# Altium PCB CSI2-KRIA-KV260_Rev01.PcbDoc (part 3 of 3)
Units mm, origin at the board's own origin, x right, y up, seen from the top; angles counter-clockwise.
Board outline 119 x 44.5 mm, 4 copper layers (Layer1 Top, Layer2, Layer3, Layer4 Bottom), stack 1.59 mm thick; 145 components, 82 nets, 488 pads, 229 vias.
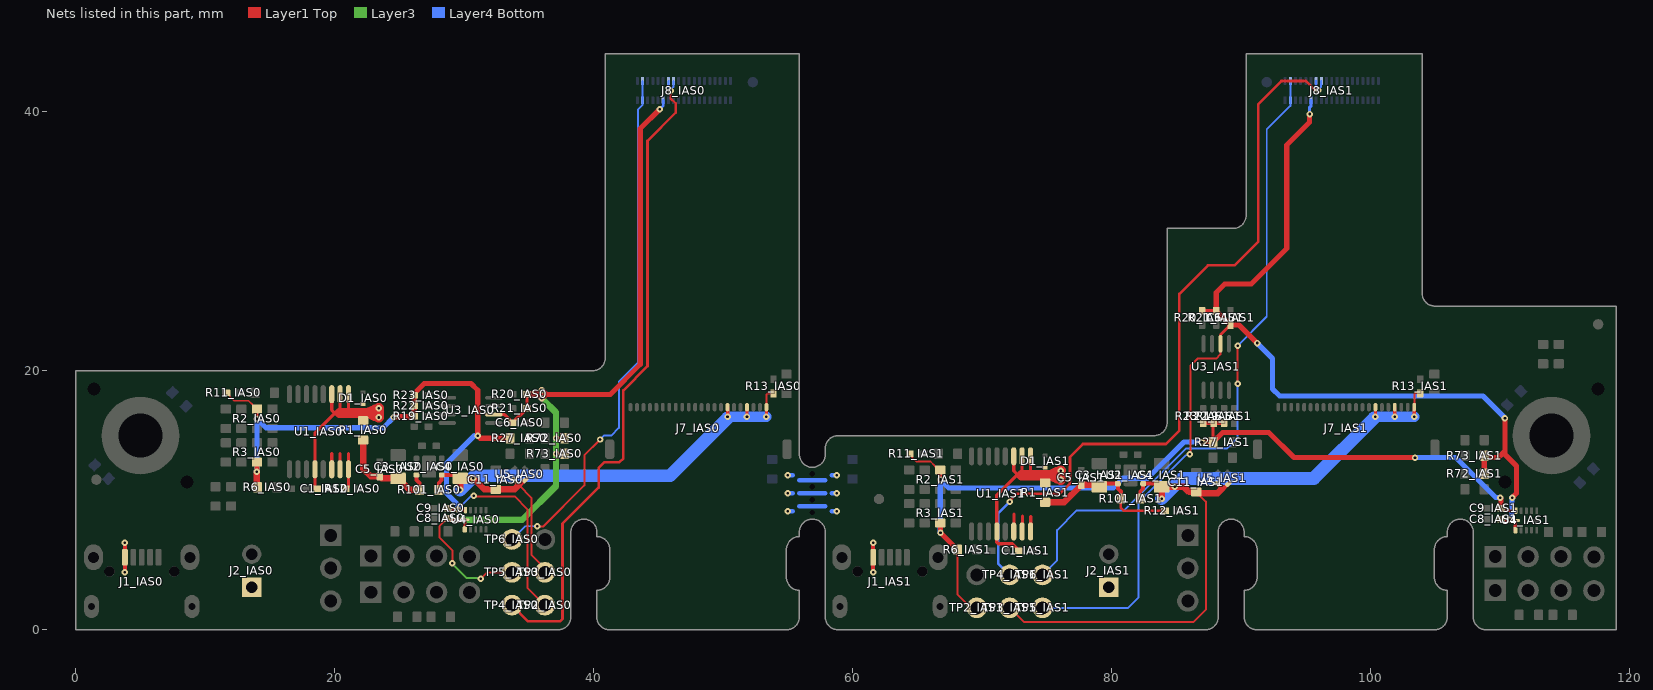
[diagram p5: the nets of this part, all layers, seen from the top]

## Via types
v1: diameter 0.5, hole 0.2, Layer1 Top to Layer4 Bottom, 229 vias

## Nets (pads, with @x,y where several pads share a name; then routed paths per layer and width w, separated by ;. In a path a pad name is that pad's centre, name@x,y a point inside that pad or via, vN(x,y) a via of type N, cw(c..) or ccw(c..) an arc to the next point about the centre after c; other vN are vias at no path point) (continued)
VCC1V2_IAS0: J8_IAS0.23 J8_IAS0.24 TP4_IAS0.1 | length 51.4
  Layer1 Top w0.2: TP4_IAS0.1@33.7,1.9 34.95,0.65 37.4,0.65 37.6,0.85 37.6,8.193 40.4,10.993 40.4,12.503 40.847,12.95 42,12.95 42.3,13.25 42.3,18.5 44.17,20.37 44.17,37.77 46.35,39.95 46.35,40.65 45.95,41.05 v1(45.95,41.65)
  Layer4 Bottom w0.15: J8_IAS0.23@45.78,42.4 45.79,42.39 45.79,42.01 ; 45.79,42.01 45.79,41.904 45.95,41.745 v1(45.95,41.65) ; v1@45.95,41.713 46.165,41.928 46.165,42.015 ; 46.165,42.015 46.165,42.385 J8_IAS0.24@46.18,42.4
VCC1V2_IAS1: J8_IAS1.23 J8_IAS1.24 TP4_IAS1.1 | length 59.2
  Layer1 Top w0.2: v1(72.15,9.9) 72.15,10 72.65,10.5 76,10.5 76.8,11.3 76.8,13.35 77.8,14.35 84.2,14.35 85.25,15.4 85.25,25.95 87.45,28.15 89.5,28.15 91.35,30 91.35,40.61 93.13,42.39 95.016,42.39 95.672,41.734 95.916,41.734 v1(95.98,41.67)
  Layer4 Bottom w0.15: J8_IAS1.23@95.81,42.42 95.82,42.41 95.82,42.03 ; 95.82,42.03 95.82,41.924 95.98,41.765 v1@95.98,41.733 ; v1(95.98,41.67) v1@95.98,41.733 ; 96.195,42.035 96.195,41.948 v1@95.98,41.733 ; 96.195,42.035 96.195,42.405 J8_IAS1.24@96.21,42.42
  Layer4 Bottom w0.2: TP4_IAS1.1@72.14,4.24 71.25,5.13 71.25,9 v1(72.15,9.9)
VCC1V8_IAS0: C6_IAS0.1 C8_IAS0.1 J8_IAS0.13 R20_IAS0.1 R21_IAS0.1 R72_IAS0.2 R73_IAS0.2 TP5_IAS0.1 U3_IAS0.2 U4_IAS0.1 U4_IAS0.12 | length 64.4
  Layer1 Top w0.15: C8_IAS0.1@28.7,8.6 28.1,8 28.1,7.139 29.1,6.139 v1(29.1,5.15) ; v1(31.3,3.95) 31.79,4.44 TP5_IAS0.1@33.7,4.44 ; v1(37.1,13.6) R73_IAS0.2@37.75,13.6 ; v1(37.1,14.8) R72_IAS0.2@37.75,14.8
  Layer1 Top w0.2: C8_IAS0.1@28.7,8.6 C8_IAS0.1@28.75,8.6 C8_IAS0.1@28.85,8.5 ; U4_IAS0.1@30.05,7.75 U4_IAS0.1@30.075,7.775
  Layer1 Top w0.25: C8_IAS0.1@28.85,8.5 v1(29.462,8.5) U4_IAS0.12@30.075,8.5 U4_IAS0.1@30.075,7.775 ; U3_IAS0.2@32.8,16.625 33.125,16.625 C6_IAS0.1@33.575,16.175 ; C6_IAS0.1@33.925,16.175 R21_IAS0.1@34.675,16.925 ; R21_IAS0.1@34.85,17.15 R20_IAS0.1@34.85,18.2
  Layer1 Top w0.4: 36.3,18.184 41.284,18.184 43.61,20.51 43.61,38.71 v1(45.1,40.2)
  Layer1 Top w0.5: R20_IAS0.1@34.95,18.2 35.7,18.2 v1(36,18.5) 36.3,18.2 ; 35.702,18.184 v1(36.002,17.884) 36.302,18.184
  Layer3 w0.15: v1(29.1,5.15) 29.1,5.1 30.2,4 31.25,4 v1(31.3,3.95)
  Layer3 w0.5: v1@29.46,8.5 34.5,8.5 37.1,11.1 v1(37.1,13.6) v1(37.1,14.8) 37.1,16.786 v1(36.002,17.884) ; v1@36,17.886 v1(36,18.5)
  Layer4 Bottom w0.15: J8_IAS0.13@45.38,40.9 J8_IAS0.13@45.39,40.89
  Layer4 Bottom w0.2: v1@45.217,40.317 45.39,40.49 J8_IAS0.13@45.39,40.89
  Layer4 Bottom w0.3: v1(45.1,40.2) v1@45.217,40.317
VCC1V8_IAS1: C6_IAS1.1 C8_IAS1.1 J8_IAS1.13 R20_IAS1.1 R21_IAS1.1 R72_IAS1.2 R73_IAS1.2 TP5_IAS1.1 U3_IAS1.2 U4_IAS1.1 U4_IAS1.12 | length 95
  Layer1 Top w0.15: v1(86.05,13.55) 86.117,13.617 86.117,20.417 86.65,20.95 88.1,20.95 88.425,21.275 U3_IAS1.2@88.425,22.1
  Layer1 Top w0.25: R20_IAS1.1@87,24.65 R21_IAS1.1@88.1,24.65 ; U3_IAS1.2@88.425,22.1 88.425,22.775 C6_IAS1.1@89.2,23.55 ; C8_IAS1.1@110.1,8.55 110.2,8.45 110.75,8.45 U4_IAS1.12@111.175,8.45 ; U4_IAS1.1@111.2,7.7 111.2,8.435 111.21,8.435 U4_IAS1.12@111.225,8.45
  Layer1 Top w0.4: v1(91.25,22.15) 89.85,23.55 C6_IAS1.1@89.2,23.55 R21_IAS1.1@88.1,24.65 88.1,26.05 88.75,26.7 90.8,26.7 93.55,29.45 93.55,37.45 95.31,39.21 v1@95.31,39.813 ; R72_IAS1.2@108.8,12.05 R73_IAS1.2@108.8,13.45 108.95,13.3 109.9,13.3 110.4,13.8 ; v1@110.4,16.3 110.4,13.8 ; v1(110.95,10.2) 111.3,10.55 111.3,12.65 110.4,13.55 110.4,13.8
  Layer4 Bottom w0.15: TP5_IAS1.1@74.68,1.7 81.3,1.7 82.1,2.5 82.1,9.85 85.733,13.483 85.983,13.483 v1(86.05,13.55)
  Layer4 Bottom w0.2: 95.39,40.44 95.42,40.47 J8_IAS1.13@95.42,40.9
  Layer4 Bottom w0.25: v1(95.31,39.84) 95.31,40.36 95.39,40.44
  Layer4 Bottom w0.4: v1(91.25,22.15) 92.45,20.95 92.45,18.6 93,18.05 108.7,18.05 v1(110.4,16.35) ; v1(110.75,8.5) 110.95,8.7 v1(110.95,10.2)
VCC2V75_IAS0: J8_IAS0.17 J8_IAS0.18 TP6_IAS0.1 | length 40.8
  Layer1 Top w0.15: v1(35.65,8) 35.6,8 35.7,7.9 v1@35.746,7.9 ; v1@35.826,7.98 36.13,7.98 39.3,11.15 39.3,13.5 v1(40.5,14.7)
  Layer4 Bottom w0.15: TP6_IAS0.1@33.7,6.98 34.72,8 v1(35.65,8) ; v1(40.5,14.7) 40.8,15 41.35,15 41.95,15.6 41.95,19.15 43.45,20.65 43.45,40.2 43.765,40.515 43.765,40.885 J8_IAS0.17@43.78,40.9 J8_IAS0.18@43.78,42.4
VCC2V75_IAS1: J8_IAS1.17 J8_IAS1.18 TP6_IAS1.1 | length 50.1
  Layer1 Top w0.15: v1(89.75,19) v1(89.75,21.95)
  Layer4 Bottom w0.15: TP6_IAS1.1@74.68,4.24 75.8,5.36 75.8,7.7 77.3,9.2 80.95,9.2 85.75,14 88.9,14 89.75,14.85 v1(89.75,19) ; v1(89.75,21.95) 92,24.2 92,38.65 93.82,40.47 J8_IAS1.17@93.82,40.9 J8_IAS1.18@93.82,42.4
VCC3V3_IAS0: C9_IAS0.1 R2_IAS0.1 R3_IAS0.1 R6_IAS0.1 R11_IAS0.1 R19_IAS0.2 R22_IAS0.2 R23_IAS0.2 R27_IAS0.2 TP2_IAS0.1 U4_IAS0.11 | length 58.8
  Layer1 Top w0.125: R11_IAS0.1@11.65,18.3 11.7,18.3 11.887,18.113 11.887,18.062 12.25,17.7 13.35,17.7 13.667,17.383 13.667,17.337 13.954,17.05 R2_IAS0.1@14,17.05
  Layer1 Top w0.15: v1(30.75,10.35) 30.8,10.3 33.9,10.3 34.89,9.31 34.89,3.25 TP2_IAS0.1@36.24,1.9
  Layer1 Top w0.25: v1(14,16.31) R2_IAS0.1@14,16.95 ; C9_IAS0.1@28.85,9.5 C9_IAS0.1@28.75,9.4 28.8,9.4 28.95,9.25 29.5,9.25 U4_IAS0.11@30.1,9.25
  Layer1 Top w0.4: v1(14,12.21) R3_IAS0.1@14,12.85 ; v1(24.55,16.4) 24.577,16.4 24.627,16.45 26.15,16.45 26.15,17.25 R22_IAS0.2@26.2,17.3 ; R23_IAS0.2@26.15,18.1 R23_IAS0.2@26.2,18.1 ; R22_IAS0.2@26.25,17.3 R22_IAS0.2@26.2,17.3 ; v1@29.5,9.25 v1(29.5,9.3) ; R27_IAS0.2@33.55,14.8 31.25,14.8 v1(31.05,15) 31.05,18.5 30.525,19.025 26.925,19.025 26.25,18.35 26.25,18.15 R23_IAS0.2@26.2,18.1 ; R22_IAS0.2@26.2,17.3 26.15,17.35 26.15,18.05 R23_IAS0.2@26.2,18.1
  Layer1 Top w0.5: R6_IAS0.1@14,10.95 v1(14,12.21)
  Layer4 Bottom w0.15: v1(29.5,9.3) 30.483,10.283 30.683,10.283 v1(30.75,10.35)
  Layer4 Bottom w0.4: v1(14,12.21) v1(14,16.31) 14.71,15.6 23.75,15.6 v1(24.55,16.4) ; v1(29.5,9.3) 29.5,9.7 28.65,10.55 28.65,12.85 30.8,15 v1(31.05,15)
  other v1: 14,12.21
VCC3V3_IAS1: C9_IAS1.1 R2_IAS1.1 R3_IAS1.1 R6_IAS1.1 R11_IAS1.1 R19_IAS1.2 R22_IAS1.2 R23_IAS1.2 R27_IAS1.2 TP2_IAS1.1 U4_IAS1.11 | length 68.2
  Layer1 Top w0.125: R11_IAS1.1@64.328,13.6 64.378,13.6 64.403,13.575 64.566,13.413 64.566,13.362 64.928,13 66.028,13 66.345,12.683 66.345,12.637 66.632,12.35 R2_IAS1.1@66.678,12.35
  Layer1 Top w0.15: R6_IAS1.1@68.1,6.2 68.1,2.75 69.15,1.7 TP2_IAS1.1@69.6,1.7
  Layer1 Top w0.2: C9_IAS1.1@110.1,9.4 110.3,9.2 U4_IAS1.11@111.2,9.2
  Layer1 Top w0.25: R2_IAS1.1@66.678,12.25 66.778,12.15 v1(66.778,11.61) ; R23_IAS1.2@87.1,15.95 R22_IAS1.2@87.9,15.95 ; R27_IAS1.2@87.85,14.5 87.85,15.9 R22_IAS1.2@87.9,15.95 ; R19_IAS1.2@88.7,15.95 R22_IAS1.2@87.9,15.95
  Layer1 Top w0.4: R3_IAS1.1@66.778,8.25 66.8,8.228 v1(66.8,7.5) R6_IAS1.1@68.1,6.2 ; v1(87,14.5) R27_IAS1.2@87.85,14.5 88.6,15.25 92.15,15.25 94.1,13.3 v1(103.45,13.3) ; v1(110.05,10.2) 110.1,10.15 C9_IAS1.1@110.1,9.4
  Layer4 Bottom w0.4: v1(66.8,7.5) 66.778,7.522 v1(66.778,11.61) 67.439,10.95 80.15,10.95 80.9,11.7 82.8,11.7 85.599,14.499 86.999,14.499 v1(87,14.5) ; v1(103.45,13.3) 106.6,13.3 109.681,10.219 110.031,10.219 v1(110.05,10.2)
VCC5V-CAM_IAS0: C3_IAS0.1 C5_IAS0.1 R1_IAS0.1 R12_IAS0.1 R101_IAS0.2 U1_IAS0.14 U1_IAS0.15 U1_IAS0.16 U2_IAS0.6 | length 13.9
  Layer1 Top w0.15: R12_IAS0.1@20.85,10.9 20.987,11.037 R12_IAS0.1@21.075,11.037
  Layer1 Top w0.2: R12_IAS0.1@21.075,11.037 U1_IAS0.16@21.075,12.4
  Layer1 Top w0.25: U1_IAS0.14@19.775,12.4 19.775,13.625 ; U1_IAS0.15@20.425,12.4 20.425,13.625 ; U1_IAS0.16@21.075,12.4 21.075,13.625
  Layer1 Top w0.3: U2_IAS0.6@26.325,11.95 26.339,11.936 26.339,11.561 26.55,11.35 R101_IAS0.2@26.55,10.8
  Layer1 Top w0.5: R1_IAS0.1@22.2,14.65 22.2,12.45 22.8,11.85 C5_IAS0.1@23.5,11.85 23.5,11.8 23.55,11.8 23.65,11.7 C3_IAS0.1@24.9,11.7 25.05,11.7 25.25,11.5 25.25,11.35 25.8,10.8 R101_IAS0.2@26.55,10.8
VCC5V-CAM_IAS1: C3_IAS1.1 C5_IAS1.1 R1_IAS1.1 R12_IAS1.1 R101_IAS1.2 U1_IAS1.14 U1_IAS1.15 U1_IAS1.16 U2_IAS1.6 | length 16.5
  Layer1 Top w0.2: R101_IAS1.2@80.728,10.137 80.728,9.422 80.95,9.2 R12_IAS1.1@84.15,9.2
  Layer1 Top w0.25: U1_IAS1.14@72.475,7.6 U1_IAS1.14@72.475,7.669 ; U1_IAS1.14@72.475,7.7 72.475,8.925 ; 72.475,8.675 U1_IAS1.14@72.475,7.669 ; U1_IAS1.14@72.544,7.6 U1_IAS1.14@72.475,7.669 ; U1_IAS1.15@73.125,7.6 73.125,8.775 ; U1_IAS1.16@73.775,7.6 73.775,8.725
  Layer1 Top w0.3: C3_IAS1.1@79.078,11.037 79.328,11.287 U2_IAS1.6@80.503,11.287 80.517,11.274 80.517,10.899 80.728,10.687 R101_IAS1.2@80.728,10.137
  Layer1 Top w0.4: C3_IAS1.1@78.928,11.187 C3_IAS1.1@79.078,11.037
  Layer1 Top w0.5: R1_IAS1.1@74.878,9.85 76.341,9.85 77.628,11.137 77.678,11.137 C5_IAS1.1@77.678,11.187 C3_IAS1.1@78.928,11.187
VCC5V-EXT: C1_IAS0.1 C1_IAS1.1 D1_IAS0.K D1_IAS1.K J1_IAS0.1 J1_IAS1.1 J2_IAS0.1 J2_IAS1.1 R1_IAS0.2 R1_IAS1.2 U1_IAS0.1 U1_IAS0.2 U1_IAS0.3 U1_IAS0.12 U1_IAS1.1 U1_IAS1.2 U1_IAS1.3 U1_IAS1.12 | length 47
  Layer1 Top w0.25: C1_IAS0.1@18.65,10.9 18.6,10.9 18.475,11.025 18.475,15.19 20.018,16.732 ; U1_IAS0.3@19.775,18.2 19.775,16.975 20.018,16.732 ; 20.15,16.6 20.018,16.732 ; 20.425,16.975 U1_IAS0.2@20.425,18.2 ; 21.075,16.975 U1_IAS0.1@21.075,18.2 ; 72.453,12.325 U1_IAS1.3@72.453,13.4 ; U1_IAS1.3@72.453,13.5 72.453,12.275 72.696,12.032 ; 72.696,11.932 71.153,10.39 U1_IAS1.12@71.153,7.6 71.153,6.747 71.25,6.65 72.35,6.65 72.8,6.2 C1_IAS1.1@72.85,6.2 ; 73.103,11.974 U1_IAS1.2@73.103,13.4 ; 73.753,11.976 U1_IAS1.1@73.753,13.4
  Layer1 Top w0.3: v1(3.8,4.46) J1_IAS0.1@3.8,5.1 ; J1_IAS0.1@3.8,6.1 v1(3.8,6.74) ; v1(61.6,4.46) J1_IAS1.1@61.6,5.1 ; J1_IAS1.1@61.6,6.1 v1(61.6,6.74)
  Layer1 Top w0.8: 20.4,16.75 23.05,16.75 ; 73.08,11.951 75.28,11.951 ; 23.05,16.75 v1(23.4,17.1) ; 23.05,16.75 v1(23.4,16.4) ; v1(23.4,16.4) v1(23.4,17.1) ; v1(23.4,16.4) 23.143,16.512 22.6,16.75 23.143,16.988 v1(23.4,17.1) ; 75.28,11.951 75.823,12.188 v1(76.08,12.301) ; 75.28,11.951 75.73,11.951 ; 75.28,11.951 75.823,11.713 v1(76.08,11.601) ; 75.73,11.951 v1(76.08,12.301) ; 75.73,11.951 v1(76.08,11.601) ; v1(76.08,11.601) v1(76.08,12.301)
  Layer4 Bottom w0.35: v1(55,9.15) 55.384,9.15 ; v1(55,10.55) 55.384,10.55 ; v1(55,11.95) 55.384,11.95 ; 55.9,9.55 57.884,9.55 ; 55.904,10.55 57.888,10.55 ; 55.904,11.55 57.888,11.55 ; 58.416,9.15 v1(58.8,9.15) ; 58.416,10.55 v1(58.8,10.55) ; 58.416,11.95 v1(58.8,11.95)
VCC-EXT-IN_IAS0: C4_IAS0.1 C11_IAS0.1 J7_IAS0.1 J7_IAS0.4 J7_IAS0.7 R13_IAS0.1 R101_IAS0.1 TP3_IAS0.1 U2_IAS0.1 U5_IAS0.3 U5_IAS0.4 | length 46.9
  Layer1 Top w0.15: 32.95,10.85 33,10.85 ; 34.25,11.2 34.25,11.15 35.2,10.2 35.2,5.8 36.24,4.76 TP3_IAS0.1@36.24,4.44 ; TP3_IAS0.1@36.44,4.44 TP3_IAS0.1@36.44,4.61 ; J7_IAS0.1@53.35,17.2 53.35,18.162 53.438,18.25 R13_IAS0.1@53.9,18.25
  Layer1 Top w0.25: v1(50.35,16.45) 50.359,16.459 50.359,17.141 J7_IAS0.7@50.35,17.15 ; v1(51.85,16.45) J7_IAS0.4@51.85,17.15 ; v1(53.35,16.45) J7_IAS0.1@53.35,17.15
  Layer1 Top w0.3: R101_IAS0.1@28.05,10.8 28.05,11.35 28.261,11.561 28.261,11.936 U2_IAS0.1@28.275,11.95 C4_IAS0.1@29.45,11.95 ; U5_IAS0.3@33.875,11.575 34.25,11.2 ; 34.275,11.125 U5_IAS0.4@34.725,11.575
  Layer1 Top w0.5: v1(29.7,10.8) 29.7,11.65 29.75,11.7 v1(30.7,11.7) 31.55,10.85 C11_IAS0.1@32.45,10.85 32.95,10.85 ; 33,10.85 33.9,10.85 34.25,11.2
  Layer4 Bottom w0.8: v1(50.35,16.45) v1(51.85,16.45) v1(53.35,16.45)
  Layer4 Bottom w1: v1(29.7,10.8) 30.8,11.9 45.9,11.9 v1@50.35,16.35
VCC-EXT-IN_IAS1: C4_IAS1.1 C11_IAS1.1 J7_IAS1.1 J7_IAS1.4 J7_IAS1.7 R13_IAS1.1 R101_IAS1.1 TP3_IAS1.1 U2_IAS1.1 U5_IAS1.3 U5_IAS1.4 | length 60.2
  Layer1 Top w0.15: TP3_IAS1.1@72.14,1.7 73.253,0.587 86.337,0.587 87.3,1.55 87.3,9.9 C11_IAS1.1@86.875,10.325 ; C11_IAS1.1@86.55,10.65 86.6,10.65 C11_IAS1.1@86.7,10.55 ; J7_IAS1.1@103.4,17.25 103.4,18.212 103.488,18.3 R13_IAS1.1@103.95,18.3
  Layer1 Top w0.25: v1(100.39,16.45) 100.399,16.459 100.399,17.141 J7_IAS1.7@100.39,17.15 ; v1(101.89,16.45) J7_IAS1.4@101.89,17.15 ; v1(103.39,16.45) J7_IAS1.1@103.39,17.15
  Layer1 Top w0.3: R101_IAS1.1@82.228,10.137 82.228,10.687 82.439,10.899 82.439,11.274 U2_IAS1.1@82.453,11.287 C4_IAS1.1@83.628,11.287 ; U5_IAS1.3@88.175,11.275 88.55,10.9 ; 88.575,10.825 U5_IAS1.4@89.025,11.275
  Layer1 Top w0.5: v1(83.878,10.137) C4_IAS1.1@83.878,11.037 ; C4_IAS1.1@83.928,11.037 v1@84.828,11.037 ; v1(84.878,11.037) 85.613,11.037 86,10.65 C11_IAS1.1@86.55,10.65 ; C11_IAS1.1@86.7,10.55 88.2,10.55 88.55,10.9
  Layer4 Bottom w0.8: v1(100.39,16.45) v1(101.89,16.45) v1(103.39,16.45)
  Layer4 Bottom w1: v1(83.878,10.137) v1@84.978,11.237 ; v1@84.878,11.128 85.45,11.7 95.64,11.7 v1@100.29,16.35
pads on no net: C50_IAS0.1 C50_IAS0.2 C50_IAS1.1 C50_IAS1.2 C51_IAS0.1 C51_IAS0.2 C51_IAS1.1 C51_IAS1.2 C52_IAS0.1 C52_IAS0.2 C52_IAS1.1 C52_IAS1.2 J1_IAS0. J1_IAS0.2 J1_IAS0.3 J1_IAS0.4 J1_IAS1. J1_IAS1.2 J1_IAS1.3 J1_IAS1.4 J7_IAS0.23 J7_IAS0.24 J7_IAS1.23 J7_IAS1.24 J8_IAS0.1 J8_IAS0.15 J8_IAS0.20 J8_IAS0.34 J8_IAS0.35 J8_IAS0.36 J8_IAS0.37 J8_IAS0.38 J8_IAS1.1 J8_IAS1.15 J8_IAS1.20 J8_IAS1.34 J8_IAS1.35 J8_IAS1.36 J8_IAS1.37 J8_IAS1.38 MRK1.1 MRK2.1 MRK3.1 MRK4.1 MRK5.1 MRK6.1 U1_IAS0.13 U1_IAS1.13 U2_IAS0.3 U2_IAS1.3 U4_IAS0.4 U4_IAS0.5 U4_IAS0.7 U4_IAS0.8 U4_IAS1.4 U4_IAS1.5 U4_IAS1.7 U4_IAS1.8
copper on no net: | length 8
  Layer1 Top w0.2: 10.856,3.27 11.856,3.27 ; 10.95,5.31 10.95,6.31 ; 10.95,5.81 11.95,5.81 ; 11.356,2.77 11.356,3.77 ; 77.056,3.27 78.056,3.27 ; 77.15,5.31 77.15,6.31 ; 77.15,5.81 78.15,5.81 ; 77.556,2.77 77.556,3.77

## Polygon pours and split planes (outlines as drawn)
GND on Layer3 "C-GND-IAS1" (solid, remove dead copper, pour order 9): 109.5,9.8 86.5,9.8 86.5,2.4 81.9,2.4 81.9,4.7 78.8,4.7 78.8,13.2 75.4,13.2 75.4,4.7 65.5,4.7 65.5,4.1 63,4.1 63,15 83.35,15 83.35,31 89.55,31 89.55,44 104.85,44 104.9,43.95 104.9,31 109.75,31 109.75,25 119,25 119,0 113,0 113,10.1 115,10.1 115,21.1 109.5,21.1
C-GND_IAS1 on Layer3 "C-GND-IAS1" (solid, remove dead copper, pour order 10): 109.7,9.6 86.7,9.6 86.7,2.2 57.9,2.2 57.9,0 112.8,0 112.8,10.3 114.8,10.3 114.8,20.9 109.7,20.9
GND on Layer3 "C-GND-IAS1" (solid, remove dead copper, pour order 3): 40.4,20 40.4,44 56,44 56,13.1 40.4,13.1 40.4,11.8 36.75,11.8 36.75,10.2 24.5,10.2 24.5,17.9 21.1,17.9 21.1,4.7 7.8,4.7 7.8,4.1 5.4,4.1 5.4,7.8 2.8,7.8 2.8,10.2 13,10.2 13,20
VCC5V-EXT on Layer3 "C-GND-IAS1" (solid, remove dead copper, pour order 2): 36.3,10 36.3,10.55 36.9,10.55 36.9,11.6 40.6,11.6 40.6,12.9 55.9,12.9 55.9,0 10.4,0 10.4,2.2 2.8,2.2 2.8,7.6 5.2,7.6 5.2,3.9 8,3.9 8,4.5 21.3,4.5 21.3,17.7 24.3,17.7 24.3,10
VCC5V-EXT on Layer3 "C-GND-IAS1" (solid, remove dead copper, pour order 8): 57.9,15 57.9,2.4 81.7,2.4 81.7,4.5 78.6,4.5 78.6,13 75.6,13 75.6,4.5 64.9,4.5 64.9,3.9 62.8,3.9 62.8,15
C-GND_IAS0 on Layer3 "C-GND-IAS1" (solid, remove dead copper, pour order 0): 10.2,2 10.2,0 0,0 0,20 12.8,20 12.8,10.4 2.6,10.4 2.6,2
GND on Layer2 "C-GND-IAS1" (solid, remove dead copper, pour order 11): 109.5,9.8 86.5,9.8 86.5,2.4 57.9,2.4 57.9,15 82.7,15 82.7,31 89.4,31 89.4,44 105.25,44 105.25,31.05 105.2,31 110.45,31 110.45,25.25 110.2,25 119,25 119,0 113,0 113,10.1 115,10.1 115,21.1 109.5,21.1
C-GND_IAS1 on Layer2 "C-GND-IAS1" (solid, remove dead copper, pour order 7): 109.7,9.6 86.7,9.6 86.7,2.2 57.9,2.2 57.9,0 112.8,0 112.8,10.3 114.8,10.3 114.8,20.9 109.7,20.9
GND on Layer2 "C-GND-IAS1" (solid, remove dead copper, pour order 6): 10.4,2.2 10.4,0 55.9,0 55.9,44 39.65,44 39.65,20 13,20 13,10.2 2.8,10.2 2.8,2.2
C-GND_IAS0 on Layer2 "C-GND-IAS1" (solid, remove dead copper, pour order 5): 10.2,2 10.2,0 0,0 0,20 12.8,20 12.8,10.4 2.6,10.4 2.6,2

## Keep-outs
Keep-Out Layer:
  lines w0.4: 40.251,7.2 cw(c40.251,6.2) 41.251,6.2 41.251,4.05 cw(c40.251,4.05) 40.251,3.05 40.25,3.05 40.25,0.99 40.251,1.001 ccw(c41.25,1) 41.249,0.001 ; 40.251,7.2 40.252,7.2 ; 40.252,7.2 40.252,7.55 ccw(c39.252,7.55) 38.252,7.55 38.25,7.55 38.25,0.999 cw(c37.251,0.999) 37.251,0 37.26,0 1,0 0,0 0,20 39.9,20 ccw(c39.9,21) 40.9,21 40.9,44.5 55.9,44.5 55.9,15 55.899,14.991 55.899,13.55 55.9,13.55 ccw(c56.9,13.55) 57.9,13.55 57.9,14 cw(c58.9,14) 58.9,15 83,15 83.3,15 ccw(c83.3,16) 84.3,16 84.3,31.001 89.401,31.001 ccw(c89.401,32) 90.4,32 90.4,44.5 104,44.5 104,26 ccw(c105,26) 105,25 119,25 119,0 108.94,0 108.949,0 cw(c108.949,0.999) 107.95,0.999 107.95,7.55 107.948,7.55 ccw(c106.948,7.55) 105.948,7.55 105.948,7.2 105.949,7.2 ccw(c105.949,6.2) 104.949,6.2 104.949,6.21 104.949,4.05 ccw(c105.949,4.05) 105.949,3.05 105.948,3.05 105.948,1 105.949,1 cw(c104.95,1) 104.95,0 91.25,0 cw(c91.25,1) 90.251,1 90.252,1 90.252,3.05 90.251,3.05 ccw(c90.251,4.05) 91.251,4.05 91.251,6.2 ccw(c90.251,6.2) 90.251,7.2 90.252,7.2 90.252,7.55 ccw(c89.252,7.55) 88.252,7.55 88.25,7.55 88.25,0.999 cw(c87.251,0.999) 87.251,0 87.26,0 58.9,0 cw(c58.9,0.999) 57.901,0.999 57.901,7.55 57.899,7.55 ccw(c56.899,7.55) 55.899,7.55 55.899,7.2 55.9,7.2 ccw(c55.9,6.2) 54.9,6.2 54.9,6.21 54.9,4.05 ccw(c55.9,4.05) 55.9,3.05 55.899,3.05 55.899,1 55.9,1 cw(c54.901,0.999) 54.901,0 54.9,0 41.25,0 ; 41.249,0.001 41.25,0

## Other copper
Layer1 Top:
  region net VCC5V-EXT: 75.278,12.286 75.378,12.286 75.028,12.636 74.728,12.636 74.428,12.336 73.928,12.336 73.878,12.386 73.628,12.386 73.578,12.336 73.278,12.336 73.228,12.386 72.628,12.386 72.578,12.436 72.328,12.436 72.328,11.986 72.778,11.536 75.278,11.536
  region net VCC5V-EXT: 75.28,12.286 75.38,12.286 75.03,12.636 74.73,12.636 74.43,12.336 73.93,12.336 73.88,12.386 73.63,12.386 73.58,12.336 73.28,12.336 73.23,12.386 72.63,12.386 72.58,12.436 72.33,12.436 72.33,11.986 72.78,11.536 75.28,11.536
  region net VCC5V-EXT: 75.28,12.286 75.38,12.286 75.03,12.636 74.73,12.636 74.43,12.336 73.93,12.336 73.88,12.386 73.63,12.386 73.58,12.336 73.28,12.336 73.23,12.386 72.63,12.386 72.58,12.436 72.33,12.436 72.33,11.986 72.78,11.536 75.28,11.536
  region net VCC5V-CAM_IAS1: 73.928,8.636 73.928,9.136 74.378,9.586 74.878,9.586 75.278,9.586 75.278,10.086 73.428,10.086 72.328,8.986 72.328,8.536 72.578,8.536 72.628,8.586 73.228,8.586 73.278,8.636 73.578,8.636 73.628,8.586 73.878,8.586
  region net VCC5V-CAM_IAS0: 21.25,13.436 21.25,13.936 21.7,14.386 22.2,14.386 22.6,14.386 22.6,14.886 20.75,14.886 19.65,13.786 19.65,13.336 19.9,13.336 19.95,13.386 20.55,13.386 20.6,13.436 20.9,13.436 20.95,13.386 21.2,13.386
  region net VCC5V-CAM_IAS0: 21.25,13.436 21.25,13.936 21.7,14.386 22.2,14.386 22.6,14.386 22.6,14.886 20.75,14.886 19.65,13.786 19.65,13.336 19.9,13.336 19.95,13.386 20.55,13.386 20.6,13.436 20.9,13.436 20.95,13.386 21.2,13.386
  region net VCC5V-EXT: 22.6,17.086 22.7,17.086 22.35,17.436 22.05,17.436 21.75,17.136 21.25,17.136 21.2,17.186 20.95,17.186 20.9,17.136 20.6,17.136 20.55,17.186 19.95,17.186 19.9,17.236 19.65,17.236 19.65,16.786 20.1,16.336 22.6,16.336
  region net VCC5V-EXT: 22.6,17.086 22.7,17.086 22.35,17.436 22.05,17.436 21.75,17.136 21.25,17.136 21.2,17.186 20.95,17.186 20.9,17.136 20.6,17.136 20.55,17.186 19.95,17.186 19.9,17.236 19.65,17.236 19.65,16.786 20.1,16.336 22.6,16.336
  region net GND: 57.3,10.15 57.3,9.95 57.025,9.675 58.4,8.3 58.4,12.8 57.025,11.425 57.3,11.15 57.3,10.95 56.9,10.55
  region net GND: 56.5,10.95 56.5,11.15 56.775,11.425 55.4,12.8 55.4,8.3 56.775,9.675 56.5,9.95 56.5,10.15 56.9,10.55
  text "ON" at 105.347,20.772 h0.8 r90
  text "IAS0" at 53.7,20.75 h1 r90
  text "ON" at 55.21,20.75 h0.8 r90
  text "IAS1" at 104.05,20.75 h1 r90
  text "1" at 2.2,18.5 h0.8
  text "PS" at 9.3,18.5 h0.8
  text "J7" at 91.05,11.9 h0.8
  text "CAM" at 93.35,11.9 h0.8
  text "J7" at 41.055,11.74 h0.8
  text "CAM" at 43.355,11.74 h0.8
  text "J1" at 59.69,7.32 h0.8
  text "J1" at 1.5,7.3 h0.8
  text "J10" at 21.95,7.25 h0.7
  text "J10" at 108.98,7.21 h0.7
  text "PWREN" at 84.35,4.55 h0.8 r90
  text "PWREN" at 18.1,4.25 h0.8 r90
  text "J6" at 18.1,1.45 h0.8 r90
  text "J6" at 84.3,1.45 h0.8 r90
  text "CSI2-KRIA-KV260 Rev.01" at 90.99,0.99 h0.68
  text "DC IN 5V" at 10.3,0.94 h0.8
  text "DC IN 5V" at 76.5,0.94 h0.8
  text "1" at 108.752,0.838 h0.6
  text "J9" at 109.48,0.81 h0.7
  text "1" at 21.672,0.778 h0.6
  text "J9" at 22.6,0.7 h0.7
Layer2:
  text "2" at 2.9,18.5 h0.8
  text "Layer 2" at 72.5,-11.5 h0.9
Layer3:
  text "3" at 4,18.5 h0.8
  text "Layer 3" at 72.5,-11.5 h0.9
Layer4 Bottom:
  region net VCC5V-EXT: 55.4,12.125 56.075,12.125 56.775,11.425 56.5,11.15 56.5,10.95 56.9,10.55 56.5,10.15 56.5,9.95 56.775,9.675 56.075,8.975 55.4,8.975
  region net VCC5V-EXT: 58.396,8.975 57.721,8.975 57.021,9.675 57.296,9.95 57.296,10.15 56.896,10.55 57.296,10.95 57.296,11.15 57.021,11.425 57.721,12.125 58.396,12.125
  text "4" at 4.9,18.5 h0.8
  text "SS" at 10.8,18.5 h0.8

## Silkscreen, mask and mechanical layers (free items; w line width, h text height)
Top Overlay:
  lines w0.1: 76.4,0.8 83.2,0.8 ; 10.2,0.8 10.2,8.34 ; 10.2,0.8 10.2,8.34 ; 10.2,0.8 17,0.8 ; 10.2,0.8 17,0.8 ; 10.2,8.34 17,8.34 17,0.8 ; 83.2,0.8 83.2,8.34 76.41,8.34 76.41,0.8 83.2,0.8
Top Solder:
  lines w0.25: 10.856,3.27 11.856,3.27 ; 10.95,5.31 10.95,6.31 ; 10.95,5.81 11.95,5.81 ; 11.356,2.77 11.356,3.77 ; 77.056,3.27 78.056,3.27 ; 77.15,5.31 77.15,6.31 ; 77.15,5.81 78.15,5.81 ; 77.556,2.77 77.556,3.77
  text "ON" at 105.35,20.77 h0.8 r90
  text "IAS0" at 53.7,20.75 h1 r90
  text "ON" at 55.21,20.75 h0.8 r90
  text "IAS1" at 104.05,20.75 h1 r90
  text "J7" at 91.05,11.9 h0.8
  text "CAM" at 93.35,11.9 h0.8
  text "J7" at 41.048,11.74 h0.8
  text "CAM" at 43.348,11.74 h0.8
  text "J1" at 59.69,7.32 h0.8
  text "J1" at 1.5,7.3 h0.8
  text "J10" at 21.95,7.25 h0.7
  text "J10" at 108.98,7.21 h0.7
  text "PWREN" at 84.35,4.55 h0.8 r90
  text "PWREN" at 18.1,4.25 h0.8 r90
  text "J6" at 18.1,1.45 h0.8 r90
  text "J6" at 84.3,1.45 h0.8 r90
  text "CSI2-KRIA-KV260 Rev.01" at 90.99,0.99 h0.68
  text "DC IN 5V" at 10.3,0.95 h0.8
  text "DC IN 5V" at 76.5,0.95 h0.8
  text "1" at 108.752,0.838 h0.6
  text "J9" at 109.48,0.81 h0.7
  text "1" at 21.673,0.778 h0.6
  text "J9" at 22.6,0.7 h0.7
Mechanical 1:
  lines w0.025: 37.251,0 ccw(c37.251,0.999) 38.25,0.999 38.25,7.55 ; 37.26,0 1,0 0,0 0,20 1,20 17,20 39.9,20 ccw(c39.9,21) 40.9,21 40.9,44 40.9,44.5 ; 38.252,7.55 cw(c39.252,7.55) 40.252,7.55 40.252,7.2 cw(c40.251,6.2) 41.251,6.2 41.251,4.05 cw(c40.251,4.05) 40.251,3.05 ; 40.25,0.99 40.25,3.05 ; 40.251,1.001 ccw(c41.25,1) 41.249,0.001 54.9,0 ; 54.9,6.2 cw(c55.9,6.2) 55.9,7.2 ; 54.9,6.21 54.9,4.05 ccw(c55.9,4.05) 55.9,3.05 ; 54.901,0 ccw(c54.901,0.999) 55.9,1 ; 55.899,1 55.899,3.05 ; 55.899,7.2 55.899,7.55 cw(c56.899,7.55) 57.899,7.55 ; 55.899,13.55 55.899,14.991 ; 55.9,13.55 ccw(c56.9,13.55) 57.9,13.55 57.9,14 cw(c58.9,14) 58.9,15 83,15 ; 55.9,15 55.9,44.5 40.9,44.5 ; 57.901,7.55 57.901,0.999 ccw(c58.9,0.999) 58.9,0 87.26,0 ; 84.3,31 84.3,16 cw(c83.3,16) 83.3,15 83,15 ; 84.3,31.001 89.401,31.001 ccw(c89.401,32) 90.4,32 90.4,44 90.4,44.5 ; 87.251,0 ccw(c87.251,0.999) 88.25,0.999 88.25,7.55 ; 88.252,7.55 cw(c89.252,7.55) 90.252,7.55 90.252,7.2 ; 90.251,1 ccw(c91.25,1) 91.25,0 104.95,0 ccw(c104.95,1) 105.949,1 ; 90.251,3.05 ccw(c90.251,4.05) 91.251,4.05 91.251,6.2 ccw(c90.251,6.2) 90.251,7.2 ; 90.252,1 90.252,3.05 ; 104.949,6.2 cw(c105.949,6.2) 105.949,7.2 ; 104.949,6.21 104.949,4.05 ccw(c105.949,4.05) 105.949,3.05 ; 105.948,1 105.948,3.05 ; 105.948,7.2 105.948,7.55 cw(c106.948,7.55) 107.948,7.55 ; 107.95,7.55 107.95,0.999 ccw(c108.949,0.999) 108.949,0 ; 108.94,0 119,0 119,1 119,24 119,25 ; 117.999,25 119,25 ; 118,25 110,25 105,25 cw(c105,26) 104,26 104,32 104,44.5 90.4,44.5 ; 40.9,44.5 40.9,44.5 ; 83,15 83,15 ; 90.4,44.5 90.4,44.5 ; 119,25 119,25
Mechanical 5:
  region: 54.1,13.2 42.1,13.2 42.1,-1.2 54.1,-1.2
  region: 104.1,13.2 92.1,13.2 92.1,-1.2 104.1,-1.2
Drill Drawing:
  circle w0.1: c65.133,62.839 r0.389
  circle w0.1: c65.133,61.089 r0.233
  circle w0.1: c65.133,61.089 r0.389
  lines w0.1: -12.472,61.7 -7.896,61.7 2.234,61.7 11,61.7 17.827,61.7 24.331,61.7 ; -12.472,63.3 -7.896,63.3 2.234,63.3 11,63.3 17.827,63.3 24.331,63.3 ; -12.472,64.9 -7.896,64.9 2.234,64.9 11,64.9 17.827,64.9 24.331,64.9 ; -12.472,66.5 -7.896,66.5 2.234,66.5 11,66.5 17.827,66.5 24.331,66.5 ; -12.472,68.1 -7.896,68.1 2.234,68.1 11,68.1 17.827,68.1 24.331,68.1 ; -12.472,69.7 -7.896,69.7 2.234,69.7 11,69.7 17.827,69.7 24.331,69.7 ; -12.472,71.3 -7.896,71.3 2.234,71.3 11,71.3 17.827,71.3 24.331,71.3 ; -12.472,72.9 -7.896,72.9 2.234,72.9 11,72.9 17.827,72.9 24.331,72.9 ; -12.472,74.5 -7.896,74.5 2.234,74.5 11,74.5 17.827,74.5 24.331,74.5 ; -12.472,76.1 -7.896,76.1 2.234,76.1 11,76.1 17.827,76.1 24.331,76.1 ; -12.472,77.7 24.331,77.7 ; -7.896,79.3 -7.896,60.1 ; 2.234,79.3 2.234,60.1 ; 11,79.3 11,60.1 ; 17.827,79.3 17.827,60.1 ; 64.052,60.175 115.565,60.175 ; 64.052,75.925 115.565,75.925 ; 69.862,58.425 69.862,77.675 ; 76.611,58.425 76.611,77.675 ; 88.315,58.425 88.315,77.675 ; 92.892,58.425 92.892,77.675 ; 99.713,58.425 99.713,77.675 ; -7.896,60.1 -12.472,60.1 -12.472,79.3 24.331,79.3 24.331,60.1 17.827,60.1 ; -7.896,60.1 2.234,60.1 ; 2.234,60.1 11,60.1 ; 11,60.1 17.827,60.1 ; 64.052,58.425 115.565,58.425 115.565,77.675 64.052,77.675 64.052,58.425 ; 64.744,64.2 65.522,64.2 65.522,64.978 64.744,64.978 64.744,64.2 ; 64.744,66.728 65.522,66.728 65.133,65.95 64.744,66.728 ; 64.744,67.895 64.939,67.895 65.133,67.7 65.328,67.895 65.522,67.895 65.328,68.089 65.522,68.283 65.328,68.283 65.133,68.478 64.939,68.283 64.744,68.283 64.939,68.089 64.744,67.895 ; 64.744,69.45 65.133,69.645 65.522,69.45 65.328,69.839 65.522,70.228 65.133,70.033 64.744,70.228 64.939,69.839 64.744,69.45 ; 64.744,71.395 64.939,71.395 64.939,71.2 65.328,71.2 65.328,71.395 65.522,71.395 65.522,71.783 65.328,71.783 65.328,71.978 64.939,71.978 64.939,71.783 64.744,71.783 64.744,71.395 ; 64.744,72.95 64.744,73.145 64.939,73.339 64.744,73.533 64.744,73.728 64.939,73.728 65.133,73.533 65.328,73.728 65.522,73.728 65.522,73.533 65.328,73.339 65.522,73.145 65.522,72.95 65.328,72.95 65.133,73.145 64.939,72.95 64.744,72.95 ; 64.744,74.7 65.133,74.895 65.522,74.7 65.328,75.089 65.522,75.478 65.133,75.283 64.744,75.478 64.939,75.089 64.744,74.7 ; 64.9,74.856 65.133,74.972 65.367,74.856 65.25,75.089 65.367,75.322 65.133,75.206 64.9,75.322 65.017,75.089 64.9,74.856
  text "Layer" at -11.572,78.1 h0.8
  text "Name" at -6.996,78.1 h0.8
  text "Material" at 3.134,78.1 h0.8
  text "Thickness" at 11.9,78.1 h0.8
  text "Constant" at 18.727,78.1 h0.8
  text "Top Overlay" at -6.996,76.5 h0.8
  text "Symbol" at 65.102,76.45 h0.84
  text "Hit Count" at 70.387,76.45 h0.84
  text "Finished Hole Size" at 77.136,76.45 h0.84
  text "Plated" at 88.84,76.45 h0.84
  text "Hole Type" at 93.417,76.45 h0.84
  text "Drill Layer Pair" at 100.238,76.45 h0.84
  text "Top Solder" at -6.996,74.9 h0.8
  text "Solder Resist" at 3.134,74.9 h0.8
  text "0,025mm" at 11.9,74.9 h0.8
  text "4" at 18.727,74.9 h0.8
  text "229" at 70.387,74.7 h0.7
  text "0,200mm (7,87mil)" at 77.136,74.7 h0.7
  text "PTH" at 88.84,74.7 h0.7
  text "Round" at 93.417,74.7 h0.7
  text "Layer1 Top - Layer4 Bottom" at 100.238,74.7 h0.7
  text "1" at -11.572,73.3 h0.8
  text "Layer1 Top" at -6.996,73.3 h0.8
  text "0,035mm" at 11.9,73.3 h0.8
  text "L 125um / S 125um / L 125um : Zd=100 Ohm" at 25.5,73.25 h0.8
  text "4" at 70.387,72.95 h0.7
  text "0,400mm (15,75mil)" at 77.136,72.95 h0.7
  text "NPTH" at 88.84,72.95 h0.7
  text "Round" at 93.417,72.95 h0.7
  text "Layer1 Top - Layer4 Bottom" at 100.238,72.95 h0.7
  text "Dielectric1" at -6.996,71.7 h0.8
  text "PP-006" at 3.134,71.7 h0.8
  text "0,160mm" at 11.9,71.7 h0.8
  text "4.7" at 18.727,71.7 h0.8
  text "4" at 70.387,71.2 h0.7
  text "0,550mm (21,65mil)" at 77.136,71.2 h0.7
  text "PTH" at 88.84,71.2 h0.7
  text "Slot" at 93.417,71.2 h0.7
  text "Layer1 Top - Layer4 Bottom" at 100.238,71.2 h0.7
  text "2" at -11.572,70.1 h0.8
  text "Layer2" at -6.996,70.1 h0.8
  text "0,035mm" at 11.9,70.1 h0.8
  text "4" at 70.387,69.45 h0.7
  text "0,800mm (31,50mil)" at 77.136,69.45 h0.7
  text "NPTH" at 88.84,69.45 h0.7
  text "Round" at 93.417,69.45 h0.7
  text "Layer1 Top - Layer4 Bottom" at 100.238,69.45 h0.7
  text "Dielectric2" at -6.996,68.5 h0.8
  text "Core-039" at 3.134,68.5 h0.8
  text "1,130mm" at 11.9,68.5 h0.8
  text "4.74" at 18.727,68.5 h0.8
  text "4" at 70.387,67.7 h0.7
  text "0,850mm (33,47mil)" at 77.136,67.7 h0.7
  text "PTH" at 88.84,67.7 h0.7
  text "Slot" at 93.417,67.7 h0.7
  text "Layer1 Top - Layer4 Bottom" at 100.238,67.7 h0.7
  text "3" at -11.572,66.9 h0.8
  text "Layer3" at -6.996,66.9 h0.8
  text "0,035mm" at 11.9,66.9 h0.8
  text "4" at 70.387,65.95 h0.7
  text "0,900mm (35,43mil)" at 77.136,65.95 h0.7
  text "PTH" at 88.84,65.95 h0.7
  text "Round" at 93.417,65.95 h0.7
  text "Layer1 Top - Layer4 Bottom" at 100.238,65.95 h0.7
  text "Dielectric3" at -6.996,65.3 h0.8
  text "PP-006" at 3.134,65.3 h0.8
  text "0,160mm" at 11.9,65.3 h0.8
  text "4.7" at 18.727,65.3 h0.8
  text "4" at 70.387,64.2 h0.7
  text "1,000mm (39,37mil)" at 77.136,64.2 h0.7
  text "NPTH" at 88.84,64.2 h0.7
  text "Round" at 93.417,64.2 h0.7
  text "Layer1 Top - Layer4 Bottom" at 100.238,64.2 h0.7
  text "L 125um / S 125um / L 125um : Zd=100 Ohm" at 25.5,63.75 h0.8
  text "4" at -11.572,63.7 h0.8
  text "Layer4 Bottom" at -6.996,63.7 h0.8
  text "0,035mm" at 11.9,63.7 h0.8
  text "34" at 70.387,62.45 h0.7
  text "1,000mm (39,37mil)" at 77.136,62.45 h0.7
  text "PTH" at 88.84,62.45 h0.7
  text "Round" at 93.417,62.45 h0.7
  text "Layer1 Top - Layer4 Bottom" at 100.238,62.45 h0.7
  text "Bottom Solder" at -6.996,62.1 h0.8
  text "Solder Resist" at 3.134,62.1 h0.8
  text "0,025mm" at 11.9,62.1 h0.8
  text "4" at 18.727,62.1 h0.8
  text "2" at 70.387,60.7 h0.7
  text "3,400mm (133,86mil)" at 77.136,60.7 h0.7
  text "PTH" at 88.84,60.7 h0.7
  text "Round" at 93.417,60.7 h0.7
  text "Layer1 Top - Layer4 Bottom" at 100.238,60.7 h0.7
  text "Bottom Overlay" at -6.996,60.5 h0.8
  text "289 Total" at 70.387,58.95 h0.7
  text "Total board thickness:" at -11.572,58.9 h0.8
  text "1,640mm" at 11.9,58.9 h0.8
  text "Slot definitions :" at 65.102,57.292 h0.7
  text "Routed Path Length" at 73.635,57.292 h0.7
  text "= Calculated from tool start centre position to tool end centre position." at 83.825,57.292 h0.7
  text "Hole Length" at 73.635,56.159 h0.7
  text "= Routed Path Length + Tool Size = Slot length as defined in the PCB layout" at 79.829,56.159 h0.7

## Dimensions
0,20 to 40.9,44 on Drill Drawing
104,44.5 to 119,25 on Drill Drawing
90.4,44 to 104,44.5 on Drill Drawing
0,0 to 117.999,25 on Drill Drawing
0,0 to 0,20 on Drill Drawing
0,0 to 55.9,15 on Drill Drawing
0,0 to 104,44.5 on Drill Drawing
40.9,44 to 55.9,44.5 on Drill Drawing
119,25 to 0,0 on Drill Drawing
84.3,31 to 90.4,44 on Drill Drawing

## Text inside footprints (layer, text, board x,y; h text height)
J2_IAS0: Top Overlay "1" at 13.85,3.3 h0.5 r90
J2_IAS1: Top Overlay "1" at 80.05,3.3 h0.5 r90
J6_IAS0: Top Overlay "1" at 19.7,7.3 h0.5 r270
J6_IAS1: Top Overlay "3" at 85.9,2.22 h0.5 r270; Top Overlay "1" at 85.9,7.3 h0.5 r270
J7_IAS0: Top Overlay "1" at 53.4,16.2 h0.5; Top Overlay "22" at 42.4,16.2 h0.5
J7_IAS1: Top Overlay "22" at 92.44,16.2 h0.5; Top Overlay "1" at 103.34,16.2 h0.5
J8_IAS0: Bottom Overlay "17" at 43.78,41.05 h0.5; Bottom Overlay "18" at 43.78,41.75 h0.5; Bottom Overlay "1" at 50.83,41.05 h0.5; Bottom Overlay "34" at 50.93,41.75 h0.5
J8_IAS1: Bottom Overlay "34" at 100.97,41.75 h0.5; Bottom Overlay "1" at 100.87,41.05 h0.5; Bottom Overlay "18" at 93.82,41.75 h0.5; Bottom Overlay "17" at 93.82,41.05 h0.5
J9_IAS0: Top Overlay "4" at 30.42,2.9 h0.5; Top Overlay "1" at 22.8,2.9 h0.5
J10_IAS0: Top Overlay "1" at 22.8,5.7 h0.5; Top Overlay "4" at 30.42,5.7 h0.5
T1: Drill Drawing "All drills (PTH and NPTH) should run in one work process" at -11.65,-16.6 h0.8; Mechanical 16 "Project:" at 40.35,-9.6 h0.89; Mechanical 16 "Layer Name:" at 72.35,-9.6 h0.89; Mechanical 16 "Germany" at 87.6,-5.35 h0.89; Mechanical 16 "Stadtroda" at 75.1,-7.1 h0.89; Mechanical 16 "Taschenweg 2a" at 74.85,-5.35 h0.89; Mechanical 16 "Allied Vision" at 65.6,-5.35 h0.89; Mechanical 16 "Date:" at 40.35,-14.1 h0.89; Mechanical 16 "Title:" at 40.35,-5.1 h0.89; Mechanical 16 "PCB Designer:" at 56.35,-9.6 h0.89; Mechanical 16 "File Name:" at 56.35,-14.1 h0.89; Mechanical 16 "Technologies" at 65.6,-6.85 h0.89; Mechanical 16 "Bare Board Number:" at 95.35,-9.6 h0.89; Mechanical 16 "Bare Board Revision:" at 95.35,-5.1 h0.89; Mechanical 16 "2" at 14.6,-18.1 h0.5; Mechanical 16 "3" at 34.6,-18.1 h0.5; Mechanical 16 "4" at 54.6,-18.1 h0.5; Mechanical 16 "5" at 74.6,-18.1 h0.5; Mechanical 16 "6" at 94.6,-18.1 h0.5; Mechanical 16 "7" at 114.6,-18.1 h0.5; Mechanical 16 "1" at -5.4,-18.1 h0.5; Mechanical 16 "1" at -5.4,80.9 h0.5; Mechanical 16 "7" at 114.6,80.9 h0.5; Mechanical 16 "6" at 94.6,80.9 h0.5; Mechanical 16 "5" at 74.6,80.9 h0.5; Mechanical 16 "4" at 54.6,80.9 h0.5; Mechanical 16 "3" at 34.6,80.9 h0.5; Mechanical 16 "2" at 14.6,80.9 h0.5; Mechanical 16 "A" at -14.767,71.35 h0.5; Mechanical 16 "B" at -14.767,51.35 h0.5; Mechanical 16 "C" at -14.767,31.35 h0.5; Mechanical 16 "D" at -14.767,11.35 h0.5; Mechanical 16 "E" at -14.767,-8.65 h0.5; Mechanical 16 "E" at 124.233,-8.65 h0.5; Mechanical 16 "D" at 124.233,11.35 h0.5; Mechanical 16 "C" at 124.233,31.35 h0.5; Mechanical 16 "B" at 124.233,51.35 h0.5; Mechanical 16 "A" at 124.233,71.35 h0.5
T2: Mechanical 15 "Project:" at 122.85,-9.6 h0.89; Mechanical 15 "2" at 95.1,-18.1 h0.5; Mechanical 15 "3" at 75.1,-18.1 h0.5; Mechanical 15 "4" at 55.1,-18.1 h0.5; Mechanical 15 "5" at 35.1,-18.1 h0.5; Mechanical 15 "6" at 15.1,-18.1 h0.5; Mechanical 15 "7" at -4.9,-18.1 h0.5; Mechanical 15 "1" at 115.1,-18.1 h0.5; Mechanical 15 "1" at 115.1,80.9 h0.5; Mechanical 15 "7" at -4.9,80.9 h0.5; Mechanical 15 "6" at 15.1,80.9 h0.5; Mechanical 15 "5" at 35.1,80.9 h0.5; Mechanical 15 "4" at 55.1,80.9 h0.5; Mechanical 15 "3" at 75.1,80.9 h0.5; Mechanical 15 "2" at 95.1,80.9 h0.5; Mechanical 15 "A" at 124.467,71.35 h0.5; Mechanical 15 "B" at 124.467,51.35 h0.5; Mechanical 15 "C" at 124.467,31.35 h0.5; Mechanical 15 "D" at 124.467,11.35 h0.5; Mechanical 15 "E" at 124.467,-8.65 h0.5; Mechanical 15 "E" at -14.533,-8.65 h0.5; Mechanical 15 "D" at -14.533,11.35 h0.5; Mechanical 15 "C" at -14.533,31.35 h0.5; Mechanical 15 "B" at -14.533,51.35 h0.5; Mechanical 15 "A" at -14.533,71.35 h0.5; Mechanical 15 "Layer Name:" at 90.85,-9.6 h0.89; Mechanical 15 "Germany" at 75.6,-5.35 h0.89; Mechanical 15 "Stadtroda" at 88.1,-7.1 h0.89; Mechanical 15 "Taschenweg 2a" at 88.35,-5.35 h0.89; Mechanical 15 "Allied Vision" at 97.6,-5.35 h0.89; Mechanical 15 "Date:" at 122.85,-14.1 h0.89; Mechanical 15 "Title:" at 122.85,-5.1 h0.89; Mechanical 15 "PCB Designer:" at 106.85,-9.6 h0.89; Mechanical 15 "File Name:" at 106.85,-14.1 h0.89; Mechanical 15 "Technologies" at 97.6,-6.85 h0.89; Mechanical 15 "Bare Board Number:" at 67.85,-9.6 h0.89; Mechanical 15 "Bare Board Revision:" at 67.85,-5.1 h0.89